# Altium PCB synth.PcbDoc (part 1 of 2)
Units mil, origin at the board's own origin, x right, y up, seen from the top; angles counter-clockwise.
Board outline 6645.14 x 4985.02 mil, 4 copper layers (Signal 1, GND, PWR, Signal 2), stack 23.756 mil thick; 99 components, 74 nets, 340 pads, 56 vias.
Unrouted connection lines stored in the file: 198.
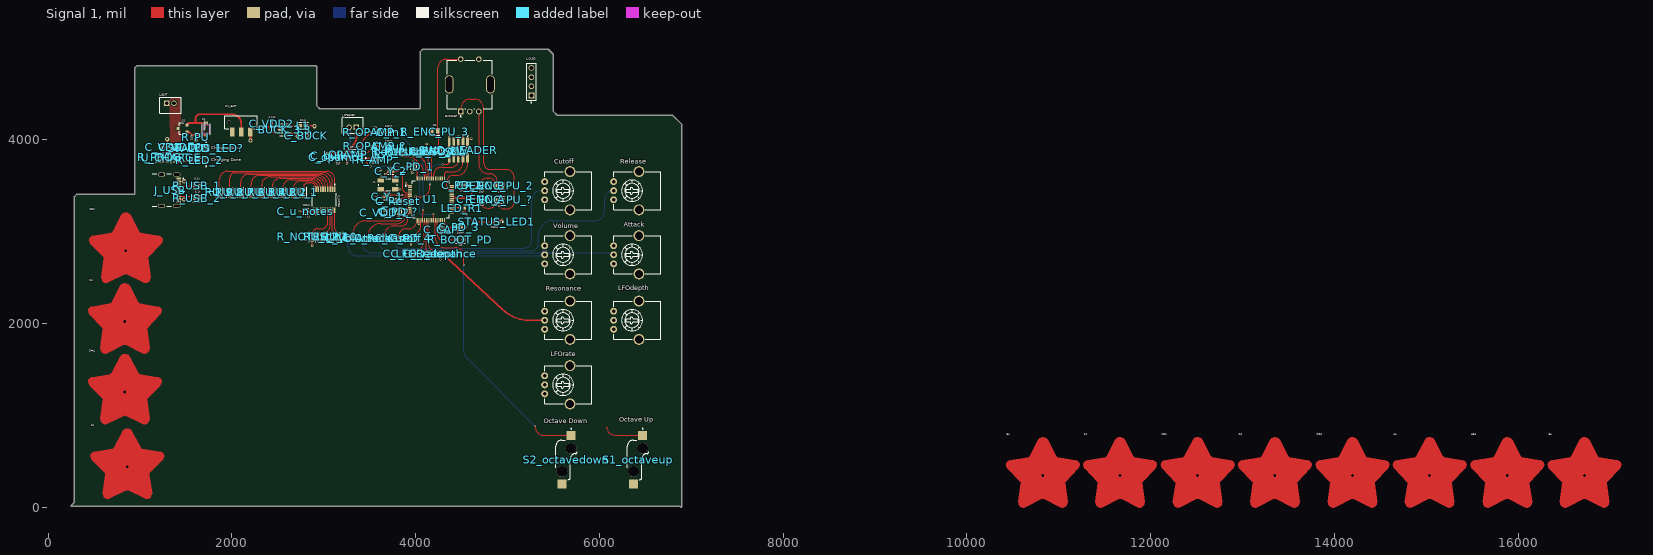
[diagram p0: Signal 1 view]
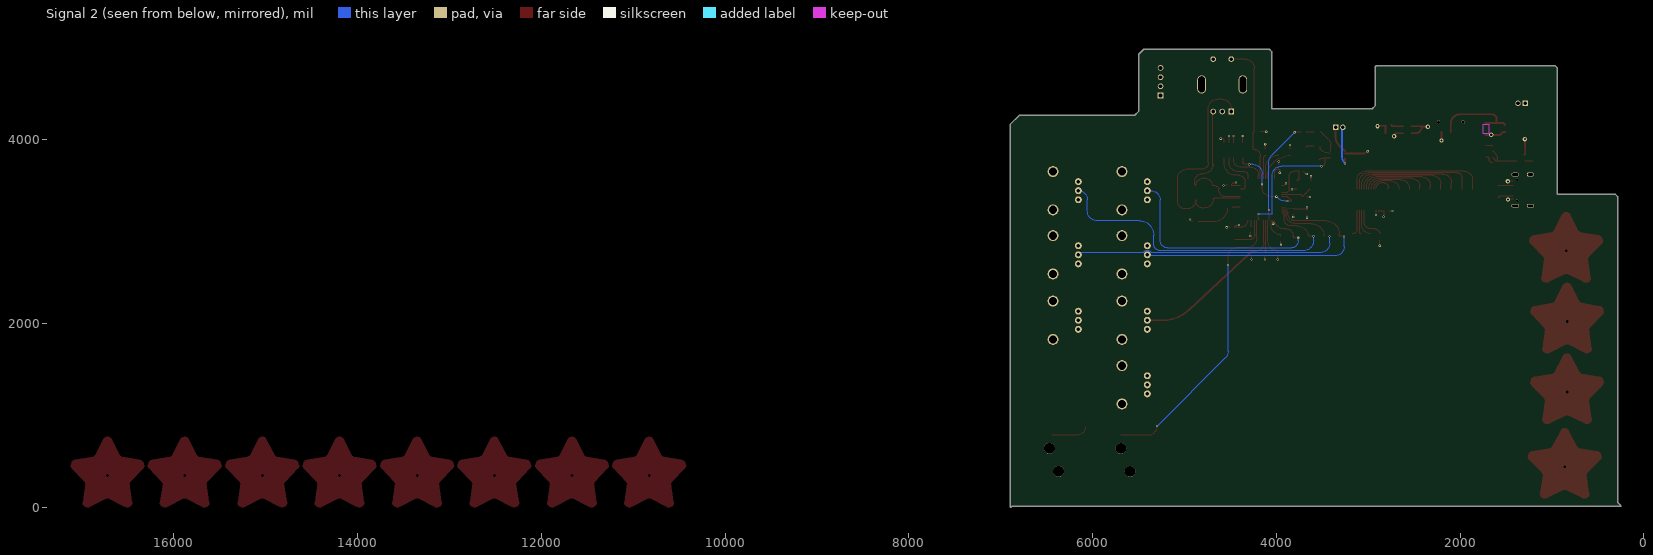
[diagram p1: Signal 2 view, seen from below]
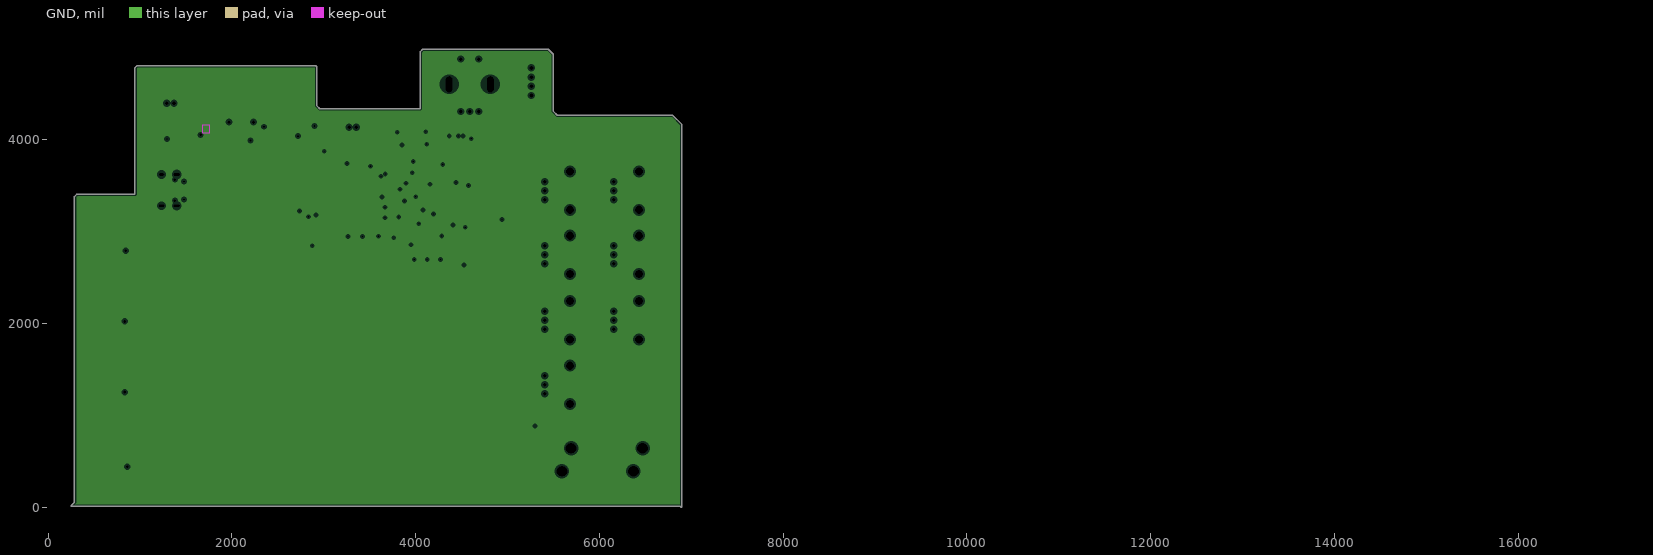
[diagram p2: GND, clearances drawn from the general rule]
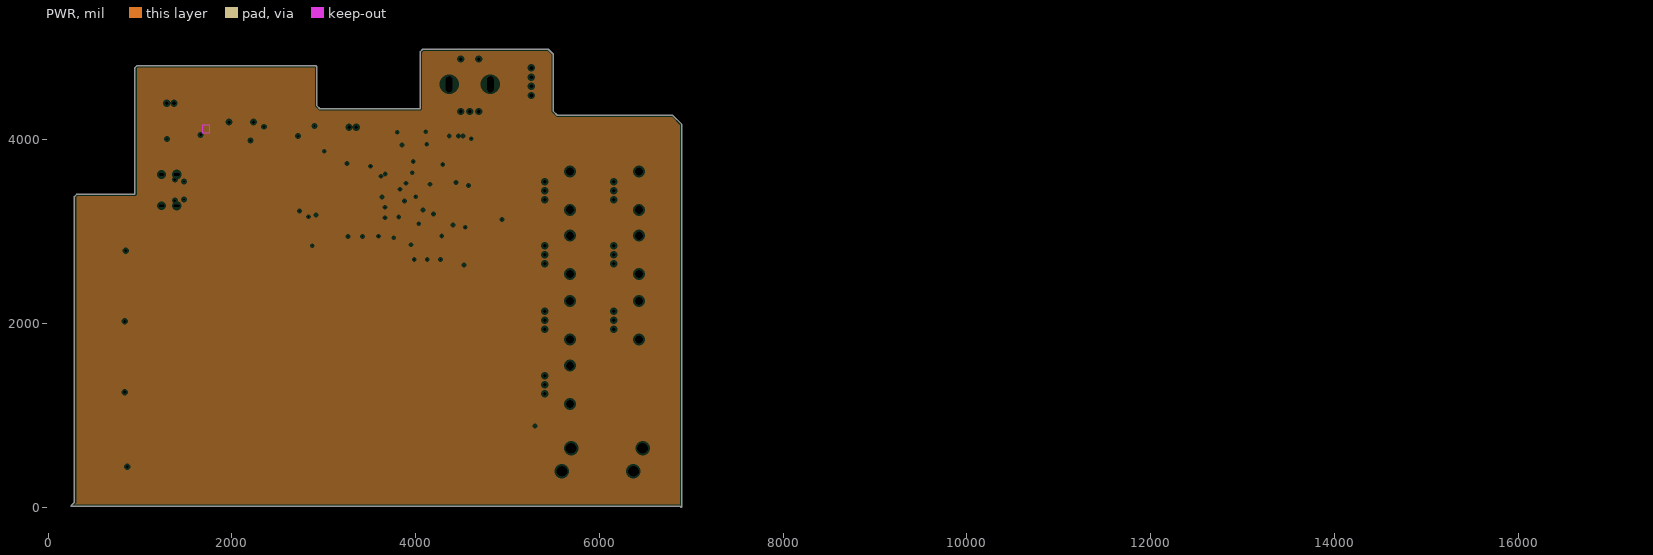
[diagram p3: PWR, clearances drawn from the general rule]

## Layer stack, top to bottom
Top Solder: solder mask 0.4, Solder Resist, Dk 3.5
Signal 1: signal copper 1.4
Dielectric 2: prepreg 2.8, PP-006, Dk 4.1
GND: plane copper 1.378
Dielectric 1: dielectric 12.6, FR-4, Dk 4.8
PWR: plane copper 1.378
Dielectric 3: prepreg 2.8, PP-006, Dk 4.1
Signal 2: signal copper 1.4
Bottom Solder: solder mask 0.4, Solder Resist, Dk 3.5

## Board outline
251.35,18.56 ccw(c254.88,15) 254.88,9.98 6877.92,9.98 6886.45,1.45 6886.44,1.47 ccw(c6890,5) 6895.02,5 6895.02,4165 6893.55,4168.55 6798.55,4263.55 6795,4265.02 5542.08,4265.02 5500.02,4307.08 5500.02,4925 5498.55,4928.55 5443.55,4983.55 5440,4985.02 4080,4985.02 4076.45,4983.55 4051.45,4958.55 4049.99,4955 4049.99,4335.02 2957.08,4335.02 2925.01,4367.08 2925.01,4790 2923.55,4793.55 2913.55,4803.55 2910,4805.02 970,4805.02 966.45,4803.55 946.45,4783.55 944.99,4780 944.99,3405.01 312.66,3405.01 309.11,3403.55 287.78,3382.22 286.31,3378.67 286.31,53.52

## Design rules (kind name [scope] priority, off if disabled: settings)
Clearance [All] p1: gap=5 ignorepadtopadclearanceinfootprint=TRUE
MinimumAnnularRing [All] p1: minimumring=10
PlaneClearance [All] p1: clearance=20
PlaneConnect [All] p1: planeconnectstyle=Relief reliefexpansion=20 reliefentries=4 reliefconductorwidth=10 reliefairgap=10
PolygonConnect [All] p1: connectstyle=Relief reliefconductorwidth=10 reliefentries=4 polygonreliefangle="90 Angle" airgapwidth=10
RoutingVias [All] p1: holewidth=12 width=24 viastyle="Through Hole" minholewidth=12 minwidth=24 maxholewidth=28 maxwidth=50
SolderMaskExpansion [All] p1: expansion=0 istentingtop=FALSE
SupplyNets "Schematic Supply Nets_2" [InNet('3.3V')] p1: voltage=0.000
SupplyNets "Schematic Supply Nets_1" [InNet('V_batt')] p2: voltage=0.000
SupplyNets "Schematic Supply Nets" [InNet('GND')] p3: voltage=0.000
Width [All] p1: maxlimit=20 minlimit=10 preferedwidth=10
28 further rules are at their usual default settings.

## Classes and differential pairs
component class synth-schematic: C_ENC_A C_ENC_B C_ENC_SW C_Y_1 C_Y_2 ENCODER J_OLED J_USB LED_R1 R_BOOT_PD R_ENC_PU_2 R_ENC_PU_3 R_ENC_PU_? R_NOTES_PU R_PULLUP_SCL R_PULLUP_SDA R_USB_1 R_USB_2 STATUS_LED1 SWD_HEADER U1 Y1
component class Power: bootrsisor BUCK_3.3 C_BUCK C_CAP C_PD_1 C_PD_2 C_PD_3 C_PD_4 C_PD_? C_Reset C_VDD C_VDD2 C_VDD? C_VDD_2 "Charging Done" D1 J_BATT L1 Q1 R_LED_1 R_LED_2 R_PROG R_PU STATUS_LED? SW_BATT U_CHARGE
component class Audio: A4 A#4 Attack B4 C4 C#4 C_Attack C_bulk C_Cutoff C_in C_LFO_depth C_LFO_rate C_opamp1 C_out C_Release C_Resonance C_u_notes C_Volume Cutoff D4 D#4 E4 F4 F#4 G4 G#4 J_SPEAKER LFOdepth LFOrate OPAMP_1 R_AMP R_OPAMP_1 R_OPAMP_? Release Resonance RU_1 RU_2 RU_3 RU_4 RU_5 RU_6 RU_7 RU_8 RU_9 RU_10 RU_11 RU_12 S1_octaveup S2_octavedown U_NOTES Volume

## Components (designator, comment, footprint, x,y, rotation, side; value= is the part's Value field where it differs from the comment)
A4 "touchpad_note" TOUCH_STAR 64640,50000 r0 top
A#4 "touchpad_note" TOUCH_STAR 65485,50000 r0 top
Attack "RK09K1130A6S" RK09K1130A6S 6155,2746.34 r270 top
B4 "touchpad_note" TOUCH_STAR 66325,50000 r0 top
bootrsisor "10k" FP-RT0603-MFG 3850,3865 r90 top value=10KΩ
BUCK_3.3 "TPS62203DBVR" FP-DBV0005A-IPC_B 2575.2,4107.28 r0 top
C4 "touchpad_note" TOUCH_STAR 50465,50095 r0 top
C#4 "touchpad_note" TOUCH_STAR 50450,52445 r0 top
C_Attack "100nF" FP-C0603C-CF-MFG 3480,2923.62 r270 top value="0.10 μF"
C_BUCK "10uF" FP-CC0603-DC-MFG 2810.93,4042.4 r270 top
C_bulk "10uF" FP-C0603C106M8PACTU-MFG 3058.61,3824.17 r90 top
C_CAP "4.7 uF" FP-CC0603-DA-MFG 4280,3020 r270 top
C_Cutoff "100nF" FP-C0603C-CF-MFG 3815,2923.62 r270 top value="0.10 μF"
C_ENC_A "10uF" FP-C0603C106M8PACTU-MFG 4711.38,3350 r180 top
C_ENC_B "10uF" FP-C0603C106M8PACTU-MFG 4711.38,3500 r180 top
C_ENC_SW "10uF" FP-C0603C106M8PACTU-MFG 4250,3872.87 r90 top
C_in "100nF" FP-C0603C-CF-MFG 3703.62,4080 r180 top value="0.10 μF"
C_LFO_depth "100nF" FP-C0603C-CF-MFG 4125,2756.38 r270 top value="0.10 μF"
C_LFO_rate "100nF" FP-C0603C-CF-MFG 3985,2756.38 r270 top value="0.10 μF"
C_opamp1 "1uF" CAPC1608X90X35ML15T15 3150,3806.54 r90 top
C_out "100nF" FP-C0603C-CF-MFG 3705,3920 r0 top value="0.10 μF"
C_PD_1 "100nF" FP-C0603C-CF-MFG 3980,3703.62 r90 top value="0.10 μF"
C_PD_2 "100nF" FP-C0603C-CF-MFG 4508.62,3505 r0 top value="0.10 μF"
C_PD_3 "100nF" FP-C0603C-CF-MFG 4477.12,3045.21 r0 top value="0.10 μF"
C_PD_4 "100nF" FP-C0603C-CF-MFG 3950,2923.62 r270 top value="0.10 μF"
C_PD_? "100nF" FP-C0603C-CF-MFG 3815,3215 r270 top value="0.10 μF"
C_Release "100nF" FP-C0603C-CF-MFG 3650,2923.62 r270 top value="0.10 μF"
C_Reset "100nF" FP-C0603C-CF-MFG 3810,3330 r180 top value="0.10 μF"
C_Resonance "100nF" FP-C0603C-CF-MFG 4270,2756.38 r270 top value="0.10 μF"
C_u_notes "100nF" FP-C0603C-CF-MFG 2800,3220 r180 top value="0.10 μF"
C_VDD "4.7uF" CAPC0603(1608)100_L 1262.44,3915 r0 top value=4.7µF
C_VDD2 "4.7uF" CAPC0603(1608)100_L 2432.21,4171.2 r270 top value=4.7µF
C_VDD? "4.7uF" CAPC0603(1608)100_L 1442.56,3915 r180 top value=4.7µF
C_VDD_2 "1uF" FP-C0603-CJ-MFG 3666.1,3204.19 r90 top
C_Volume "100nF" FP-C0603C-CF-MFG 3315,2923.62 r270 top value="0.10 μF"
C_Y_1 "27 pF" FP-C0603C-CF-MFG 3688.62,3380 r0 top
C_Y_2 "27 pF" FP-C0603C-CF-MFG 3729.3,3657.99 r180 top
"Charging Done" "APHD1608LZGCK" FP-APHD1608LZGCK-MFG 1720,3775.98 r90 top
Cutoff "RK09K1130A6S" RK09K1130A6S 5404.41,3443.66 r270 top
D1 "PMEG40T10ERX" CR_SOD123W_NEX 1720,4115 r270 top
D4 "touchpad_note" TOUCH_STAR 50439.61,51675.97 r0 top
D#4 "touchpad_note" TOUCH_STAR 50440.03,50906.93 r0 top
E4 "touchpad_note" TOUCH_STAR 60430,50000 r0 top
ENCODER "PEC11R-4215F-S0024" FP-PEC11R-4215F-S0024-MFG 4589.26,4600.48 r0 top
F4 "touchpad_note" TOUCH_STAR 61270,50000 r0 top
F#4 "touchpad_note" TOUCH_STAR 62115,50000 r0 top
G4 "touchpad_note" TOUCH_STAR 62955,50000 r0 top
G#4 "touchpad_note" TOUCH_STAR 63800,50000 r0 top
J_BATT "B2B-PH-K-S(LF)(SN)" JST-B2B-PH-K-S_V 1330.63,4373.35 r0 top
J_OLED "HTSW-104-07-G-S" FP-HTSW-104-07-G-S-MFG 5260,4630 r90 top
J_SPEAKER "B2B-PH-K-S(LF)(SN)" JST-B2B-PH-K-S_V 3315,4155 r180 top
J_USB "USB4105-GF-A-120" GCT_USB4105-GF-A-120 1235,3449.92 r270 top
L1 "MLZ1608N100LT000" FP-MLZ1608-IPC_A 2772.48,4150 r0 top
LED_R1 "220" RESC1608X55X25NL10T15 4505,3255 r180 top
LFOdepth "RK09K1130A6S" RK09K1130A6S 6155,2033.66 r270 top
LFOrate "RK09K1130A6S" RK09K1130A6S 5404.41,1331.34 r270 top
OPAMP_1 "PAM8302AASCR" FP-MSOP-8-MFG 3330,3835 r180 top
Q1 "AO3401A" AO-SOT-23-3L_V 1462.24,4120.83 r180 top
R_AMP "100k" FP-CRGP0603-IPC_C 3560.32,3780 r180 top value=100KΩ
R_BOOT_PD "10k" FP-AC0603-IPC_A 4485.48,2910 r0 top
R_ENC_PU_2 "10k" FP-AC0603-IPC_A 4909.52,3495 r0 top
R_ENC_PU_3 "10k" FP-AC0603-IPC_A 4205.48,4085 r180 top
R_ENC_PU_? "10k" FP-AC0603-IPC_A 4909.52,3345 r0 top
R_LED_1 "220" RESC1608X55X25NL10T15 1645,3905 r270 top
R_LED_2 "220" RESC1608X55X25NL10T15 1645,3775 r90 top
R_NOTES_PU "10k" FP-AC0603-IPC_A 2875,2940 r270 top
R_OPAMP_1 "150k" FP-AT0603-MFG 3555,4080 r180 top
R_OPAMP_? "150k" FP-AT0603-MFG 3555,3925 r180 top
R_PROG "2k" FP-AC0603-IPC_A 1215,3805.12 r90 top
R_PU "100k" RESC0603(1608)_N 1604.97,4025.24 r270 top value="100000.00 Ohm"
R_PULLUP_SCL "4.7k" FP-RT0603-MFG 4115,3865 r90 top value=4.7KΩ
R_PULLUP_SDA "4.7k" FP-RT0603-MFG 3975,3865 r90 top value=4.7KΩ
R_USB_1 "5.1k" FP-MCT0603-IPC_B 1620,3500 r180 top
R_USB_2 "5.1k" FP-MCT0603-IPC_B 1620,3360 r0 top
Release "RK09K1130A6S" RK09K1130A6S 6155,3443.66 r270 top
Resonance "RK09K1130A6S" RK09K1130A6S 5404.41,2033.66 r270 top
RU_1 "10k" FP-AC0603-IPC_A 2780,3424.52 r90 top
RU_2 "10k" FP-AC0603-IPC_A 2665,3425 r90 top
RU_3 "10k" FP-AC0603-IPC_A 2551.25,3425 r90 top
RU_4 "10k" FP-AC0603-IPC_A 2436.88,3425 r90 top
RU_5 "10k" FP-AC0603-IPC_A 2322.5,3425 r90 top
RU_6 "10k" FP-AC0603-IPC_A 2208.12,3425 r90 top
RU_7 "10k" FP-AC0603-IPC_A 2093.75,3425 r90 top
RU_8 "10k" FP-AC0603-IPC_A 1979.38,3425 r90 top
RU_9 "10k" FP-AC0603-IPC_A 1865,3425 r90 top
RU_10 "10k" FP-AC0603-IPC_A 3175,2940 r90 top
RU_11 "10k" FP-AC0603-IPC_A 3075,2940 r90 top
RU_12 "10k" FP-AC0603-IPC_A 2975,2940 r90 top
S1_octaveup "PG151101S11" SW_PG151101S11 6420,515 r270 top
S2_octavedown "PG151101S11" SW_PG151101S11 5641.38,515 r270 top
STATUS_LED1 "Status LED" FP-LTST-C190KRKT-MFG 4880,3105 r180 top
STATUS_LED? "Charging Active" FP-LTST-C190KRKT-MFG 1720,3905 r270 top
SW_BATT "JS102011SAQN" FP-JS102011SAQN-MFG 2101.14,4190 r180 top
SWD_HEADER "FTSH-105-01-F-DV-K" SMTC-FTSH-105-01-L-DV-K_V 4465,3885 r180 top
U1 "STM32F446RET6" FP-LQFP64-5W-MFG 4165,3350 r0 top
U_CHARGE "MCP73831T-2ATI/OT" FP-C04-091-OT-IPC_C 1340,3800.12 r180 top
U_NOTES "AT42QT2120-XUR" FP-20X-MFG 3005,3345 r270 top
Volume "RK09K1130A6S" RK09K1130A6S 5404.41,2746.34 r270 top
Y1 "ABM3B-8.000MHZ-B2-T" FP-ABM3B-MFG 3701.26,3507.24 r180 top

## Footprints (in the part's own frame and the unit in brackets; to place one, negate y for a bottom-side part, rotate by r counter-clockwise, add the part's x,y. Pads: shape width x height; smd on the part's side, far side on the other; paste and mask are expansions set on the pad)
AO-SOT-23-3L_V [mm] "SOT23, 3-Leads, Body 3.1x1.8mm, Pitch 0.95mm"
  rect 0.8x0.8 smd: 1(-1.2,0.95) 2(-1.2,-0.95) 3(1.2,0)
  silkscreen extent -1.33,-1.55 0.9,2.02, body extent -1.5,-1.55 1.5,1.55, height 1.25
CAPC0603(1608)100_L [mm] "Chip Capacitor, Body 1.6x0.8mm, Height 1.0mm, IPC High Density"
  rrect25% 0.66x0.76 smd: 1(-0.7,0) 2(0.7,0)
  silkscreen extent 0,-0.3 0,0.3, body extent -0.8,-0.4 0.8,0.4, height 0.95
CAPC1608X90X35ML15T15 [mm] "Chip Capacitor, 2-Leads, Body 1.60x0.81mm, IPC Low Density"
  rect 1.25x1.1 smd: 1(-0.85,0) 2(0.85,0)
  body extent -0.88,-0.48 0.87,0.48, height 0.9
CR_SOD123W_NEX [mil]
  rect 32x41 smd paste+0 mask+0: 1(-65,0) 2(65,0)
  Signal 1 keep-out region: -47,-35.5 -47,35.5 47,35.5 47,-35.5
  Keep-Out Layer region: -47,-35.5 -47,35.5 47,35.5 47,-35.5
  silkscreen extent -60,-43 60,43, body extent -73,-37 73,37, height 43
FP-20X-MFG [mm]
  rect 1.5x0.45 smd paste+0 mask+0: 1(-2.9,2.925) 2(-2.9,2.275) 3(-2.9,1.625) 4(-2.9,0.975) 5(-2.9,0.325) 6(-2.9,-0.325) 7(-2.9,-0.975) 8(-2.9,-1.625) 9(-2.9,-2.275) 10(-2.9,-2.925) 11(2.9,-2.925) 12(2.9,-2.275) 13(2.9,-1.625) 14(2.9,-0.975) 15(2.9,-0.325) 16(2.9,0.325) 17(2.9,0.975) 18(2.9,1.625) 19(2.9,2.275) 20(2.9,2.925)
  silkscreen extent -4.32,-3.3 1.78,3.3, body extent -3.75,-3.4 3.75,3.4, height 0.25
FP-ABM3B-MFG [mm]
  rect 1.8x1.2 smd paste+0 mask+0: 1(-2,-1.2) 2(2,-1.2) 3(2,1.2) 4(-2,1.2)
  silkscreen extent -2.55,-2.5 2.55,1.65, body extent -3,-1.9 3,1.9, height 0.25
FP-AC0603-IPC_A [mil]
  rect 41.68x39.85 smd paste+0 mask+0: 1(-34.52,0) 2(34.52,0)
  silkscreen extent -55,-36 55,36, body extent -75,-40 75,40, height 10
FP-APHD1608LZGCK-MFG [mm]
  rect 0.7x0.8 smd paste+0 mask+0: 1(-0.75,0) 2(0.75,0)
  silkscreen extent -1.8,-0.48 0.03,0.48, body extent -1.2,-0.58 1.2,0.58, height 0.25
FP-AT0603-MFG [mm]
  rect 0.9x0.8 smd paste+0 mask+0: 1(-0.85,0) 2(0.85,0)
  silkscreen extent 0,-0.45 0,0.45, body extent -1.4,-0.55 1.4,0.55, height 0.25
FP-C04-091-OT-IPC_C [mm]
  rect 1.038x0.538 smd paste+0 mask+0: 1(-1.066,0.95)
  rrect100% 1.038x0.538 smd paste+0 mask+0: 2(-1.066,0) 3(-1.066,-0.95) 4(1.066,-0.95) 5(1.066,0.95)
  silkscreen extent -2.21,-1.45 0.05,1.45
FP-C0603-CJ-MFG [mm]
  rect 0.75x0.9 smd paste+0 mask+0: 1(-0.6,0) 2(0.6,0)
  silkscreen extent -0.82,-0.83 0.83,0.87, body extent -1.2,-0.6 1.2,0.6, height 0.25
FP-C0603C106M8PACTU-MFG [mm]
  rect 0.75x0.9 smd paste+0 mask+0: 1(-0.6,0) 2(0.6,0)
  silkscreen extent -0.9,-0.85 0.9,0.85, body extent -1.2,-0.6 1.2,0.6, height 0.25
FP-C0603C-CF-MFG [mm]
  rect 0.75x0.9 smd paste+0 mask+0: 1(-0.6,0) 2(0.6,0)
  silkscreen extent -0.87,-0.85 0.88,0.85, body extent -1.2,-0.6 1.2,0.6, height 0.25
FP-CC0603-DA-MFG [mm]
  rect 0.8x0.9 smd paste+0 mask+0: 1(-0.75,0) 2(0.75,0)
  silkscreen extent -0.85,-0.85 0.85,0.85, body extent -1.35,-0.75 1.35,0.75, height 0.25
FP-CC0603-DC-MFG [mm]
  rect 0.9x0.9 smd paste+0 mask+0: 1(-0.7,0) 2(0.7,0)
  silkscreen extent -0.9,-0.82 0.9,0.82, body extent -1.35,-0.75 1.35,0.75, height 0.25
FP-CRGP0603-IPC_C [mil]
  rect 29.85x31.97 smd paste+0 mask+0: 1(-24.68,0) 2(24.68,0)
  silkscreen extent -40,-33 40,33, body extent -44,-22 44,22, height 10
FP-DBV0005A-IPC_B [mm]
  rect 1.505x0.572 smd paste+0 mask+0: 1(-1.1,0.95)
  rrect100% 1.505x0.572 smd paste+0 mask+0: 2(-1.1,0) 3(-1.1,-0.95) 4(1.1,-0.95) 5(1.1,0.95)
  silkscreen extent -2.65,-1.7 1.4,1.7, body extent -2.1,-1.7 2.1,1.7, height 0.25
FP-HTSW-104-07-G-S-MFG [mm]
  rect 1.57x1.57 hole 1.02 paste-2539.97 mask+0: 1(-3.81,0)
  round 1.57 hole 1.02 paste-2539.97 mask+0: 2(-1.27,0) 3(1.27,0) 4(3.81,0)
  silkscreen extent -5.87,-1.27 5.14,1.27, body extent -5.24,-1.37 5.24,1.37, height 0.25
FP-JS102011SAQN-MFG [mm]
  rect 1.2x2.5 smd paste+0 mask+0: 1(-2.5,2.75) 2(0,2.75) 3(2.5,2.75)
  round 0.9 hole 0.9 unplated paste-2539.97 mask+0: ""(-3.4,0) ""(3.4,0)
  silkscreen extent -4.5,-1.8 4.5,1.8, body extent -4.6,-3.9 4.6,4.1, height 0.25
FP-LQFP64-5W-MFG [mm]
  rect 1.2x0.3 smd paste+0 mask+0: 1(-5.75,3.75) 2(-5.75,3.25) 3(-5.75,2.75) 4(-5.75,2.25) 5(-5.75,1.75) 6(-5.75,1.25) 7(-5.75,0.75) 8(-5.75,0.25) 9(-5.75,-0.25) 10(-5.75,-0.75) 11(-5.75,-1.25) 12(-5.75,-1.75) 13(-5.75,-2.25) 14(-5.75,-2.75) 15(-5.75,-3.25) 16(-5.75,-3.75) 33(5.75,-3.75) 34(5.75,-3.25) 35(5.75,-2.75) 36(5.75,-2.25) 37(5.75,-1.75) 38(5.75,-1.25) 39(5.75,-0.75) 40(5.75,-0.25) 41(5.75,0.25) 42(5.75,0.75) 43(5.75,1.25) 44(5.75,1.75) 45(5.75,2.25) 46(5.75,2.75) 47(5.75,3.25) 48(5.75,3.75)
  rect 0.3x1.2 smd paste+0 mask+0: 17(-3.75,-5.75) 18(-3.25,-5.75) 19(-2.75,-5.75) 20(-2.25,-5.75) 21(-1.75,-5.75) 22(-1.25,-5.75) 23(-0.75,-5.75) 24(-0.25,-5.75) 25(0.25,-5.75) 26(0.75,-5.75) 27(1.25,-5.75) 28(1.75,-5.75) 29(2.25,-5.75) 30(2.75,-5.75) 31(3.25,-5.75) 32(3.75,-5.75) 49(3.75,5.75) 50(3.25,5.75) 51(2.75,5.75) 52(2.25,5.75) 53(1.75,5.75) 54(1.25,5.75) 55(0.75,5.75) 56(0.25,5.75) 57(-0.25,5.75) 58(-0.75,5.75) 59(-1.25,5.75) 60(-1.75,5.75) 61(-2.25,5.75) 62(-2.75,5.75) 63(-3.25,5.75) 64(-3.75,5.75)
  silkscreen extent -7.02,-5.1 5.1,5.1
FP-LTST-C190KRKT-MFG [mm]
  rect 0.8x0.8 smd paste+0 mask+0: 1(-0.75,0) 2(0.75,0)
  silkscreen extent -1.86,-0.82 0.82,0.82, body extent -1.25,-0.55 1.25,0.55, height 0.25
FP-MCT0603-IPC_B [mil]
  rect 34x37.88 smd paste+0 mask+0: 1(-28.72,0) 2(28.72,0)
  silkscreen extent -46,-35 46,35, body extent -56,-29 56,29, height 10
FP-MLZ1608-IPC_A [mil]
  rect 47.48x41.66 smd paste+0 mask+0: 1(-32.52,0) 2(32.52,0)
  silkscreen extent -56,-37 56,37, body extent -76,-41 76,41, height 10
FP-MSOP-8-MFG [mm]
  rect 1.35x0.45 smd paste+0 mask+0: 1(-1.975,0.975) 2(-1.975,0.325) 3(-1.975,-0.325) 4(-1.975,-0.975) 5(1.975,-0.975) 6(1.975,-0.325) 7(1.975,0.325) 8(1.975,0.975)
  silkscreen extent -3.35,-1.55 0.92,1.55, body extent -2.75,-1.65 2.75,1.65, height 0.25
FP-PEC11R-4215F-S0024-MFG [mm]
  round 1.55 hole 1 paste-2539.97 mask+0: 1(-2.5,7) 2(2.5,7) B(2.5,-7.5) C(0,-7.5)
  rrect100% 2.4x5 hole 4.4 slot 1.8 at 0 deg paste-2539.97 mask+0: 3(-5.7,0) 4(5.7,0)
  rect 1.55x1.55 hole 1 paste-2539.97 mask+0: A(-2.5,-7.5)
  silkscreen extent -6.25,-8.95 6.25,6.7, body extent -7,-8.37 7,7.88, height 0.25
FP-RT0603-MFG [mm]
  rect 0.9x0.8 smd paste+0 mask+0: 1(-0.85,0) 2(0.85,0)
  silkscreen extent -0.85,-0.81 0.86,0.8, body extent -1.4,-0.55 1.4,0.55, height 0.25
GCT_USB4105-GF-A-120 [mm]
  rect 0.6x1.15 smd: A1_B12(-3.2,4.755) A4_B9(-2.4,4.755) B1_A12(3.2,4.755) B4_A9(2.4,4.755)
  rect 0.3x1.15 smd: A5(-1.25,4.755) A6(-0.25,4.755) A7(0.25,4.755) A8(1.25,4.755) B5(1.75,4.755) B6(0.75,4.755) B7(-0.75,4.755) B8(-1.75,4.755)
  oval 1x2.1 hole 0.6 slot 1.7 at 90 deg: SH1(-4.32,4.18) SH2(4.32,4.18)
  rrect50% 1x1.8 hole 0.6 slot 1.4 at 90 deg: SH3(-4.32,0) SH4(4.32,0)
  round 0.65 hole 0.65 unplated: ""(-2.89,3.68) ""(2.89,3.68)
  silkscreen extent -4.47,-2.6 4.47,6.1, body extent -4.47,-2.6 4.47,5.11, height 3.31
JST-B2B-PH-K-S_V [mm] "Connector, 2-Leads, Body 5.9x4.5mm, Pitch 2mm"
  rect 1.5x1.5 hole 1: 1(-1,0.55)
  round 1.5 hole 1: 2(1,0.55)
  silkscreen extent -2.95,-2.25 2.95,2.25, body extent -2.95,-2.25 2.95,2.25, height 6
RESC0603(1608)_N [mm] "Chip Resistor, Body 1.6x0.8mm, IPC Medium Density"
  rect 0.9x1 smd: 1(-0.8,0) 2(0.8,0)
  silkscreen extent -0.05,-0.4 0.05,0.4, body extent -0.85,-0.47 0.85,0.47, height 0.6
RESC1608X55X25NL10T15 [mm] "Chip Resistor, 2-Leads, Body 1.60x0.80mm, IPC Medium Density"
  rect 0.7x0.9 smd: 1(-0.7,0) 2(0.7,0)
  body extent -0.85,-0.45 0.85,0.45, height 0.55
RK09K1130A6S [mm]
  round 1.93 hole 1: A(-2.5,0) E(2.5,0) S(0,0)
  round 3 hole 2.3: P$1(-5.3,7) P$2(5.3,7)
  silkscreen extent -5.3,0.08 5.3,12.97
SMTC-FTSH-105-01-L-DV-K_V [mm] "CONN, 10-Leads, Body 6.35x3.43mm, Pitch 1.27mm"
  rect 0.74x2.79 smd: 1(-2.54,-2.035) 2(-2.54,2.035) 3(-1.27,-2.035) 4(-1.27,2.035) 5(0,-2.035) 6(0,2.035) 7(1.27,-2.035) 8(1.27,2.035) 9(2.54,-2.035) 10(2.54,2.035)
  silkscreen extent -3.17,-4.1 3.17,0.34, body extent -3.17,-2.92 3.18,2.92, height 6.12
SW_PG151101S11 [mm]
  rect 2.55x2.5 smd: 1(-6.725,1.27) 2(6.725,-1.27)
  round 3 hole 3 unplated: ""(-3.175,1.27) ""(3.175,-1.27)
  silkscreen extent -8.7,-2.95 5.45,2.94, body extent -7.25,-2.95 7.25,2.95, height 1.85
TOUCH_STAR [mil]
  round 1 hole 30 mask+0: 1(-49605,-49655)
  Signal 1 region: -49864.66,-49966.72 -49860.78,-49974.75 -49857.29,-49979.89 -49854.02,-49983.72 -49847.35,-49989.65 -49842.16,-49993.05 -49837.66,-49995.33 -49832.95,-49997.15 -49828.09,-49998.51 -49823.12,-49999.38 -49818.09,-49999.75 -49813.05,-49999.63 -49808.04,-49999.01 -49799.42,-49996.72 -49793.97,-49994.41 -49614.01,-49905.92 -49609.52,-49904.26 -49607.17,-49903.77 -49602.39,-49903.53 -49597.66,-49904.26 -49593.17,-49905.92 -49413.21,-49994.41 -49408.85,-49996.31 -49402.93,-49998.2 -49397.99,-49999.19 -49392.97,-49999.7 -49384.06,-49999.38 -49379.09,-49998.51 -49374.23,-49997.15 -49368.47,-49994.84 -49360.77,-49990.34 -49355.93,-49986.44 -49349.88,-49979.89 -49346.39,-49974.75 -49342.52,-49966.72 -49340.68,-49960.79 -49339.72,-49955.84 -49339.26,-49950.82 -49339.29,-49945.77 -49339.75,-49941.04 -49368.29,-49742.54 -49368.49,-49737.76 -49367.72,-49733.03 -49366.98,-49730.75 -49364.82,-49726.47 -49361.85,-49722.72 -49222.08,-49578.91 -49218.21,-49574.44 -49213.36,-49566.95 -49211.23,-49562.38 -49209.55,-49557.62 -49208.15,-49551.57 -49207.55,-49546.56 -49207.71,-49537.65 -49208.74,-49531.52 -49210.11,-49526.67 -49213.69,-49518.5 -49216.33,-49514.2 -49220.13,-49509.29 -49223.64,-49505.67 -49227.49,-49502.41 -49235.02,-49497.63 -49239.61,-49495.53 -49244.38,-49493.89 -49250.14,-49492.55 -49447.74,-49458.36 -49452.36,-49457.07 -49456.61,-49454.87 -49458.55,-49453.47 -49461.96,-49450.09 -49464.61,-49446.11 -49558.19,-49268.74 -49560.6,-49264.64 -49563.54,-49260.54 -49567.69,-49255.93 -49571.45,-49252.57 -49575.53,-49249.6 -49583.38,-49245.37 -49589.23,-49243.27 -49597.97,-49241.52 -49604.17,-49241.22 -49613.05,-49242.1 -49619.07,-49243.61 -49623.79,-49245.37 -49628.33,-49247.59 -49635.73,-49252.57 -49639.49,-49255.93 -49642.91,-49259.64 -49646.58,-49264.64 -49648.99,-49268.74 -49742.57,-49446.11 -49745.22,-49450.09 -49748.63,-49453.47 -49752.64,-49456.08 -49754.82,-49457.07 -49759.44,-49458.36 -49957.03,-49492.55 -49962.8,-49493.89 -49967.57,-49495.53 -49972.16,-49497.63 -49976.52,-49500.17 -49983.54,-49505.67 -49987.05,-49509.29 -49990.18,-49513.24 -49992.92,-49517.49 -49995.22,-49521.98 -49997.42,-49527.78 -49999.33,-49536.49 -49999.75,-49542.68 -49999.54,-49547.72 -49998.83,-49552.72 -49996.38,-49561.3 -49994.35,-49565.91 -49991.24,-49571.29 -49988.25,-49575.35 -49985.1,-49578.91 -49845.33,-49722.72 -49842.36,-49726.47 -49840.2,-49730.75 -49839.46,-49733.03 -49838.69,-49737.76 -49838.89,-49742.54 -49867.43,-49941.04 -49867.94,-49946.93 -49867.46,-49955.84 -49866.21,-49961.92
  Signal 1 lines w0.5: -49999.75,-49542.68 -49999.54,-49547.72 -49998.83,-49552.72 -49996.38,-49561.3 -49994.35,-49565.91 -49991.24,-49571.29 -49988.25,-49575.35 -49985.1,-49578.91 -49845.33,-49722.72 -49842.36,-49726.47 -49840.2,-49730.75 -49839.46,-49733.03 -49838.69,-49737.76 -49838.89,-49742.54 -49867.43,-49941.04 -49867.94,-49946.93 -49867.46,-49955.84 -49866.21,-49961.92 -49864.66,-49966.72 -49860.78,-49974.75 -49857.29,-49979.89 -49854.02,-49983.72 -49847.35,-49989.65 -49842.16,-49993.05 -49837.66,-49995.33 -49832.95,-49997.15 -49828.09,-49998.51 -49823.12,-49999.38 -49818.09,-49999.75 -49813.05,-49999.63 -49808.04,-49999.01 -49799.42,-49996.72 -49793.97,-49994.41 -49614.01,-49905.92 -49609.52,-49904.26 -49607.17,-49903.77 -49602.39,-49903.53 -49597.66,-49904.26 -49593.17,-49905.92 -49413.21,-49994.41 -49408.85,-49996.31 -49402.93,-49998.2 -49397.99,-49999.19 -49392.97,-49999.7 -49384.06,-49999.38 -49379.09,-49998.51 -49374.23,-49997.15 -49368.47,-49994.84 -49360.77,-49990.34 -49355.93,-49986.44 -49349.88,-49979.89 -49346.39,-49974.75 -49342.52,-49966.72 -49340.68,-49960.79 -49339.72,-49955.84 -49339.26,-49950.82 -49339.29,-49945.77 -49339.75,-49941.04 -49368.29,-49742.54 -49368.49,-49737.76 -49367.72,-49733.03 -49366.98,-49730.75 -49364.82,-49726.47 -49361.85,-49722.72 -49222.08,-49578.91 -49218.21,-49574.44 -49213.36,-49566.95 -49211.23,-49562.38 -49209.55,-49557.62 -49208.15,-49551.57 -49207.55,-49546.56 -49207.71,-49537.65 -49208.74,-49531.52 -49210.11,-49526.67 -49213.69,-49518.5 -49216.33,-49514.2 -49220.13,-49509.29 -49223.64,-49505.67 -49227.49,-49502.41 -49235.02,-49497.63 -49239.61,-49495.53 -49244.38,-49493.89 -49250.14,-49492.55 -49447.74,-49458.36 -49452.36,-49457.07 -49456.61,-49454.87 -49458.55,-49453.47 -49461.96,-49450.09 -49464.61,-49446.11 -49558.19,-49268.74 -49560.6,-49264.64 -49563.54,-49260.54 -49567.69,-49255.93 -49571.45,-49252.57 -49575.53,-49249.6 -49583.38,-49245.37 -49589.23,-49243.27 -49597.97,-49241.52 -49604.17,-49241.22 -49613.05,-49242.1 -49619.07,-49243.61 -49623.79,-49245.37 -49628.33,-49247.59 -49635.73,-49252.57 -49639.49,-49255.93 -49642.91,-49259.64 -49646.58,-49264.64 -49648.99,-49268.74 -49742.57,-49446.11 -49745.22,-49450.09 -49748.63,-49453.47 -49752.64,-49456.08 -49754.82,-49457.07 -49759.44,-49458.36 -49957.03,-49492.55 -49962.8,-49493.89 -49967.57,-49495.53 -49972.16,-49497.63 -49976.52,-49500.17 -49983.54,-49505.67 -49987.05,-49509.29 -49990.18,-49513.24 -49992.92,-49517.49 -49995.22,-49521.98 -49997.42,-49527.78 -49999.33,-49536.49 -49999.75,-49542.68

## Part data
Attack Cutoff LFOdepth LFOrate Release Resonance Volume: "10k Ohm 1 Gang Linear Through Hole, Snap In Potentiometer None 1.0 Kierros 0.05W, 1/20W PC Pins", Package=None, Check_prices=https://www.snapeda.com/parts/RK09K1130A6S/ALPS/view-part/?ref=eda, MF=ALPS, MP=RK09K1130A6S, SnapEDA_Link=https://www.snapeda.com/parts/RK09K1130A6S/ALPS/view-part/?ref=snap
bootrsisor: library part CMP-03412-024743-1, "RES SMD 10K OHM 0.05% 1/10W 0603", Manufacturer=Yageo, Manufacturer Part Number=RT0603WRE0710KL, Package=RT0603, Power Rating=0.1W, Resistance=10KΩ, Temperature="-55°C to +155°C", Temperature Coefficient="50 ppm/°C", Temperature Range High=+155°C, Temperature Range Low=-55°C, Tolerance=0.0005, Voltage Rating=75V, Automotive=No, Category=Res, ComponentLink2Description=Datasheet, ComponentLink2URL=http://www.yageo.com/documents/recent/PYu-RT_1-to-0.01_RoHS_L_9.pdf, Composition="Thin Film", Device Class L1="Passive Components", Device Class L2=Resistors, Device Class L3="Chip SMD Resistors", Digikey Description="RES SMD 10K OHM 0.05% 1/10W 0603", Footprint Url=http://www.yageo.com/exep/pages/download/literatures/PYu-R_Mount_10.pdf, Height=0.55mm, Ipc Land Pattern Name=RESC16080X45, Lead Free=Yes, Mouser Description="Res SMD 10K Ohm 0.05% 1/10W 0603", Octopart=https://octopart.com/rt0603wre0710kl-yageo-71396825, RoHS=TRUE, Series=RT
BUCK_3.3: library part CMP-04918-000656-1, "IC REG BUCK 3.3V 300MA SOT23-5", Case/Package=SOT-23-5, Max Input Voltage=6V, Max Operating Temperature=85°C, Max Output Current=300mA, Min Input Voltage=2.5V, Min Operating Temperature=-40°C, Min Output Voltage=3.3V, Nominal Supply Current=15uA, Package Quantity=3000, Switching Frequency=1MHz, Contact Plating=Gold, Efficiency=95%, Lead Free="Lead Free", Min Supply Voltage=2.5V, Mount="Surface Mount", Number of Outputs=1, Number of Pins=5, Operating Supply Voltage=6V, Output Configuration=Positive, Output Current=300mA, Output Type=Fixed, Output Voltage=3.3V, Packaging="Tape and Reel", Quiescent Current=15uA, Radiation Hardening=No, RoHS Compliant=Yes, Series=-, Supply Current=15uA, Synchronous Rectifier=Yes
C_Attack C_Cutoff C_in C_LFO_depth C_LFO_rate C_out C_PD_1 C_PD_2 C_PD_3 C_PD_4 C_PD_? C_Release C_Reset C_Resonance C_u_notes C_Volume: library part CMP-03020-027569-2, "C0603 0.10 μF Y5V 30ppm/°C 20.00% 25 V", Capacitance="0.10 μF", Manufacturer=KEMET, Manufacturer Part Number=C0603C104M3VAC7411, Package=C0603C-CF, Temperature="-55°C to +125°C", Temperature Characteristic=Y5V, Temperature Coefficient=30ppm/°C, Temperature Range High=+125°C, Temperature Range Low=-55°C, Tolerance=0.2, Voltage Rating="25 V", Automotive=Yes, Automotive Grade="Grade 1", Category=Cap, ComponentLink2Description=Datasheet, ComponentLink2URL=https://api.kemet.com/component-edge/download/datasheet/C0603C100J5GACAUTO.pdf, Device Class L1="Passive Components", Device Class L2=Capacitors, Device Class L3="Ceramic Capacitors", Height=0.87mm, Lead Free=Yes, Material=Ceramic, Octopart=https://octopart.com/c0603c104m3vac7411-kemet-2224281, RoHS=TRUE
C_BUCK: library part CMP-00621-81932632-1, "CC0603KRX5R7BB106 Multilayer Ceramic Capacitor, 10 uF, 16 V, ± 10%, X5R, 0603 [1608 Metric]", Capacitance=10µF, Case/Package=0603, Dielectric=X5R, Max Operating Temperature=85°C, Min Operating Temperature=-55°C, Tolerance=10%, Voltage Rating=16V, Halogen Free="Halogen Free", Height=1mm, Lead Free="Lead Free", Material=Ceramic, NexarPartId=81932632, RoHS=Non-Compliant, Voltage Rating (DC)=16V
C_bulk C_ENC_A C_ENC_B C_ENC_SW: library part CMP-03020-034654-1, "CAP CER 10UF 10V X5R 0603", RoHS Compliant=Yes
C_CAP: library part CMP-03422-001204-1, "CAP CER 4.7UF 25V X5R 0603", Manufacturer=YAGEO, Manufacturer Part Number=CC0603MRX5R8BB475, Package=CC0603-DA, Temperature="-55°C to +125°C", Temperature Characteristic=X5R, Temperature Coefficient=15%, Temperature Range High=+125°C, Temperature Range Low=-55°C, Tolerance=0.2, Voltage="25 V", Automotive=No, Capacitance="4.7 uF", Category=Cap, ComponentLink2Description=Datasheet, ComponentLink2URL=http://www.yageo.com/documents/recent/UPY-GPHC_X7R_6.3V-to-50V_18.pdf, Device Class L1="Passive Components", Device Class L2=Capacitors, Device Class L3="Ceramic Capacitors", Digikey Description="CAP CER 4.7UF 25V X5R 0603", Footprint Url=http://www.yageo.com/exep/pages/download/literatures/UPY-C_GEN_24.pdf, Height=0.9mm, Lead Free=Yes, Material=Ceramic, Octopart=https://octopart.com/cc0603mrx5r8bb475-yageo-81932637, RoHS=TRUE, Voltage Rating="25 V"
C_opamp1: library part CMP-1035-02733-2, Manufacturer=Kemet, Part Number=C0603C105K8RACTU
C_VDD C_VDD2 C_VDD?: library part CMP-001-00076-4, "Chip Capacitor, 4.7µF +/-20%, 10V, 0603, Thickness 1 mm", Case/Package=0603, Max Operating Temperature=85°C, Min Operating Temperature=-55°C, Tolerance=10%, Voltage Rating=10V, Mounting Technology=SMT, Pins=2
C_VDD_2: library part CMP-03020-024138-1, "CAP CER 0603 1UF 10V X7R 10%", Manufacturer=KEMET, Manufacturer Part Number=C0603C105K8RACAUTO, Package=C0603-CJ, Temperature="-55°C to +125°C", Temperature Characteristic=X7R, Temperature Coefficient=15%, Temperature Range High=+125°C, Temperature Range Low=-55°C, Tolerance=10%, Voltage Rating=10V, Automotive=Yes, Automotive Grade="Grade 1", Capacitance=1uF, Category=Cap, ComponentLink2Description=Datasheet, ComponentLink2URL=https://content.kemet.com/datasheets/KEM_C1023_X7R_AUTO_SMD.pdf, Device Class L1="Passive Components", Device Class L2=Capacitors, Device Class L3="Ceramic Capacitors", Digikey Description="CAP CER 0603 1UF 10V X7R 10%", Height=0.95mm, Ipc Land Pattern Name=CAPC16080X80, Lead Free=Yes, Material=Ceramic, Octopart=https://octopart.com/c0603c105k8racauto-kemet-91328492, RoHS=TRUE
C_Y_1 C_Y_2: library part CMP-03020-007366-1, "CAP CER 27PF 100V NP0 0603", Manufacturer=KEMET, Manufacturer Part Number=C0603C270F1GACTU, Package=C0603C-CF, Temperature="-55°C to +125°C", Temperature Characteristic=C0G, Temperature Coefficient=30ppm/°C, Temperature Range High=+125°C, Temperature Range Low=-55°C, Tolerance=0.01, Voltage Rating="100 V", Automotive=Yes, Automotive Grade="Grade 1", Capacitance="27 pF", Category=Cap, ComponentLink2Description=Datasheet, ComponentLink2URL=https://api.kemet.com/component-edge/download/datasheet/C0603C100J5GACAUTO.pdf, Device Class L1="Passive Components", Device Class L2=Capacitors, Device Class L3="Ceramic Capacitors", Digikey Description="CAP CER 27PF 100V NP0 0603", Height=0.87mm, Lead Free=Yes, Material=Ceramic, Mouser Description="Multilayer Ceramic Capacitors MLCC - SMD/SMT 100volts 27pF C0G 1%", Octopart=https://octopart.com/c0603c270f1gactu-kemet-9143729, RoHS=TRUE
"Charging Done": library part CMP-44529-000045-1, "LED GREEN CLEAR 1608 SMD", Case Code (Imperial)=0603, Case Code (Metric)=1608, Color=Green, Forward Voltage=2.65V, Lens Color=Colorless, Test Current=2mA, Case/Package=0603, Dominant Wavelength=525nm, Height=0.75mm, Length=1.6mm, Lens Size=0.7mm, Lens Style=Round, Lens Transparency=Clear, Luminous Intensity=180mcd, Mount="Surface Mount", Packaging="Tape and Reel", Viewing Angle=100°, Width=0.8mm
D1: "Description", Manufacturer_Name=Nexperia, Copyright="Copyright (C) 2025 Ultra Librarian. All rights reserved.", Manufacturer_Part_Number=PMEG40T10ERX, Type="Diodes - Rectifiers, Single"
ENCODER: library part CMP-1747-00012-2, "ROTARY ENCODER MECHANICAL 24PPR", Max Operating Temperature=70°C, Min Operating Temperature=-30°C, Package Quantity=150, Built in Switch=Yes, Detent=Yes, Encoder Type=Mechanical, Height=13.4mm, Hole Diameter=1.8mm, Length=21.5mm, Mount="Through Hole", Number of Channels=2, Orientation=Vertical, Output Type=Quadrature, Packaging=Bulk, Pulses per Revolution=24, Radiation Hardening=No, REACH SVHC="No SVHC", RoHS Compliant=Yes, Series=PEC11R, Termination="PC Pins", Type=Mechanical, Width=12.5mm
J_BATT J_SPEAKER: library part CMP-2000-05162-1, "Male Header, Pitch 2 mm, 1 x 2 Position, Height 6 mm, Tail Length 3.4 mm, -25 to 85 degC, RoHS, Bulk", Manufacturer=JST, Datasheet URL=http://datasheet.octopart.com/B2B-PH-K-S%28LF%29%28SN%29-JST-datasheet-8324864.pdf, Datasheet Version=Nov-08, Manufacturer URL=http://www.jst.com/home2.html, No of Positions=2, Pitch=2mm, Style/Orientation=StraightHeader/Plug, Termination=Crimp, Type=ShroudedHeader
J_OLED: library part CMP-02766-001776-1, "CONN HEADER VERT 4POS 2.54MM", Contact Material=Bronze, Contact Plating=Gold, Gender=Male, Mount="Through Hole", Number of Contacts=4, Number of Rows=1, Packaging=Bulk, Pitch=2.54mm, Radiation Hardening=No, Reach SVHC Compliant=Yes, RoHS Compliant=Yes, Series=HTSW, Termination="Through Hole"
J_USB: "USB CONN, 2.0 TYPE C, RCPT, 16POS, SMT; USB Connector Type:USB Type C; USB Standard:USB 2.0; Gender:Receptacle; No. of Positions:16Positions; Connector Mounting:Surface Mount, Through Hole Mount; Orientation:Right Angle RoHS Compliant: Yes", Package=None, Check_prices=https://www.snapeda.com/parts/USB4105GFA120/Global+Connector+Technology/view-part/?ref=eda, MF="Global Connector Technology", MP=USB4105GFA120, SnapEDA_Link=https://www.snapeda.com/parts/USB4105GFA120/Global+Connector+Technology/view-part/?ref=snap
L1: library part CMP-08253-000255-1, "Shielded Multilayer Inductor 10uH ±20% 300mA 780mΩ SMD 0603", Case Code (Imperial)=0603, Case Code (Metric)=1608, Current Rating=300mA, DC Resistance (DCR)=780mR, Inductance=10uH, Max Operating Temperature=125°C, Min Operating Temperature=-55°C, Package Quantity=4000, Saturation Current=60mA, Self Resonant Frequency=50MHz, Test Frequency=2MHz, Tolerance=20%, Case/Package=0603, Core Material=Ferrite, Height - Seated (Max)=0.037inch, Lead Free="Lead Free", Length=0.063inch, Mount="Surface Mount", Packaging="Tape and Reel", RoHS Compliant=Yes, Shielding=Shielded, Width=0.031inch
LED_R1 R_LED_1 R_LED_2: library part CMP-2000-04322-1, Manufacturer=Yageo, Part Number=RC0603JR-13220RL
OPAMP_1: library part CMP-12733-000002-1, "IC AMP CLASS D MONO 2.5W 8MSOP", Manufacturer="Diodes Inc.", Max Junction Temp=+125°C, Max Supply Voltage=5.5V, Min Supply Voltage=2V, Nominal Supply Current=4mA, Package=MSOP-8, Power At Speaker R="2.5W @ 4Ω", Temperature="-40°C to +85°C", Temperature Range High=+85°C, Temperature Range Low=-40°C, Voltage Gain=24dB, Automotive=No, Category=IC, ComponentLink2Description=Datasheet, ComponentLink2URL=https://www.diodes.com/assets/Datasheets/PAM8302A.pdf, Device Class L1="Integrated Circuits (ICs)", Device Class L2="Linear ICs", Device Class L3="Amplifiers - Audio", Digikey Description="IC AMP CLASS D MONO 2.5W 8MSOP", Footprint Url=https://www.diodes.com/assets/Package-Files/MSOP-8.pdf, Height=1.1mm, Ipc Land Pattern Name=SOP65P490X110-8, Lead Free=Yes, Manufacturer Part Number=PAM8302AASCR, Mouser Description="Audio Amplifiers 2.5W MONO FILTERLESS CLASS-D AUDIO AMP", Number of Channels=1, Octopart=https://octopart.com/pam8302aascr-diodes+inc.-29030473, RoHS=TRUE, Standoff Height=0.05mm
Q1: library part CMP-2000-05778-1, "P-Channel MOSFET, 30 V, 4 A, -55 to 150 degC, 3-Pin SOT-23-3L, RoHS, Tape and Reel", Continuous Drain Current=4A, Drain-Source On-Volt=30V, Frequency (Max)=NotRequiredMHz, Gate-Source Voltage (Max)=?12V, Manufacturer="Alpha and Omega", Operating Temp Range=-55Cto150C, Operating Temperature Classification=Military, Output Power (Max)=NotRequiredW, Package Description="3-Pin Small Outline Transistor, Body 2.95 x 1.6 mm, Pitch 0.95 mm", Package Reference=SOT-23-3L, Package Type=SOT-23, Power Dissipation=1.4W, Power Gain=NotRequireddB, Channel Mode=Enhancement, Datasheet URL=http://www.aosmd.com/res/data_sheets/AO3401A.pdf, Datasheet Version="Rev. 3, 03/2011", Drain Current (Max)=4A, Drain Efficiency=NotRequired%, Drain-Source On-Res=0.044ohm, Manufacturer URL=http://www.aosmd.com/, Mounting=SurfaceMount, Mounting Technology=SurfaceMount, Noise Figure=NotRequireddB, Number of  Elements=1, Package URL=http://www.aosmd.com/res/packaging_information/SOT-23-3L.pdf, Pin Count=3, Polarity=P, Rad Hardened=No, Type=PowerMOSFET
R_AMP: library part CMP-03211-000885-1, "CRGP 0603 100K 1%", Ambient Temperature Range High=+70°C, Manufacturer=TE, Manufacturer Part Number=CRGP0603F100K, Package=CRGP0603, Power Rating=0.25W, Resistance=100KΩ, Temperature="-55°C to +155°C", Temperature Coefficient=±100ppm/°C, Temperature Range High=+155°C, Temperature Range Low=-55°C, Tolerance=0.01, Voltage Rating=50V, Automotive=No, Category=Res, ComponentLink2Description=Datasheet, ComponentLink2URL=https://www.te.com/commerce/DocumentDelivery/DDEController?Action=srchrtrv&DocNm=9-1773463-9&DocType=DS&DocLang=English, Composition="Thick Film", Device Class L1="Passive Components", Device Class L2=Resistors, Device Class L3="Chip SMD Resistors", Digikey Description="CRGP 0603 100K 1%", Height=0.55mm, Ipc Land Pattern Name=RESC16080X45, Lead Free=Yes, Octopart=https://octopart.com/crgp0603f100k-te+connectivity-91018719, RoHS=TRUE, Series=CRGP
R_BOOT_PD R_ENC_PU_2 R_ENC_PU_3 R_ENC_PU_? R_NOTES_PU RU_1 RU_2 RU_3 RU_4 RU_5 RU_6 RU_7 RU_8 RU_9 RU_10 RU_11 RU_12: library part CMP-03412-040683-1, "RES 10kΩ 5.00% 0.2W 0603"
R_OPAMP_1 R_OPAMP_?: library part CMP-03412-030814-2, "Thin Film Chip Resistors Automotive Grade 150kΩ 0.1% 50ppm/°C 0603", Case/Package=0603, Max Operating Temperature=155°C, Max Power Dissipation=100mW, Min Operating Temperature=-55°C, Resistance=150kR, Resistor Type="Thin Film", Temperature Coefficient=50ppm/°C, Tolerance=0.1%, Features="Moisture Resistant", Height=0.022inch, Length=0.063inch, Number of Terminations=2, Packaging="Tape and Reel", RoHS Compliant=Yes, Series=AT, Width=0.032inch
R_PROG: library part CMP-03412-038916-1, "RES 2kΩ 1.00% 0.2W 0603"